# Altium PCB Main_Panel.PcbDoc
Units mm, origin at the board's own origin, x right, y up, seen from the top; angles counter-clockwise.
Board outline 34 x 59 mm, 2 copper layers (Top Layer, Bottom Layer); 4 components, 0 nets, 24 pads, 0 vias.
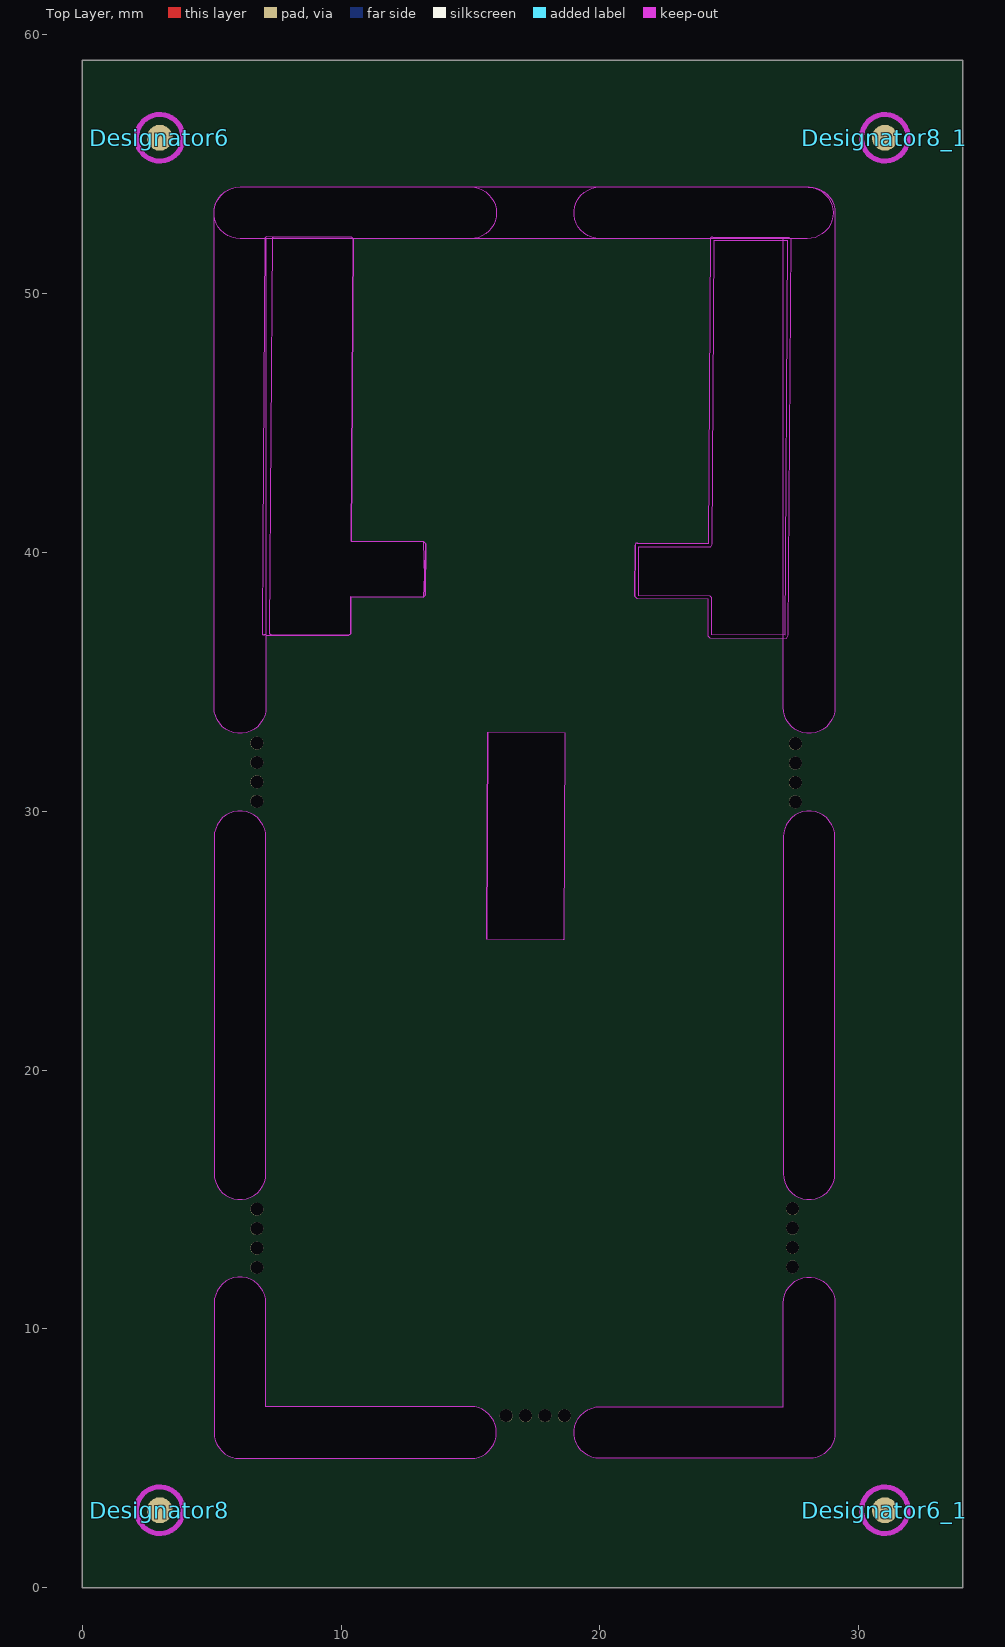
[diagram p0: Top Layer view]
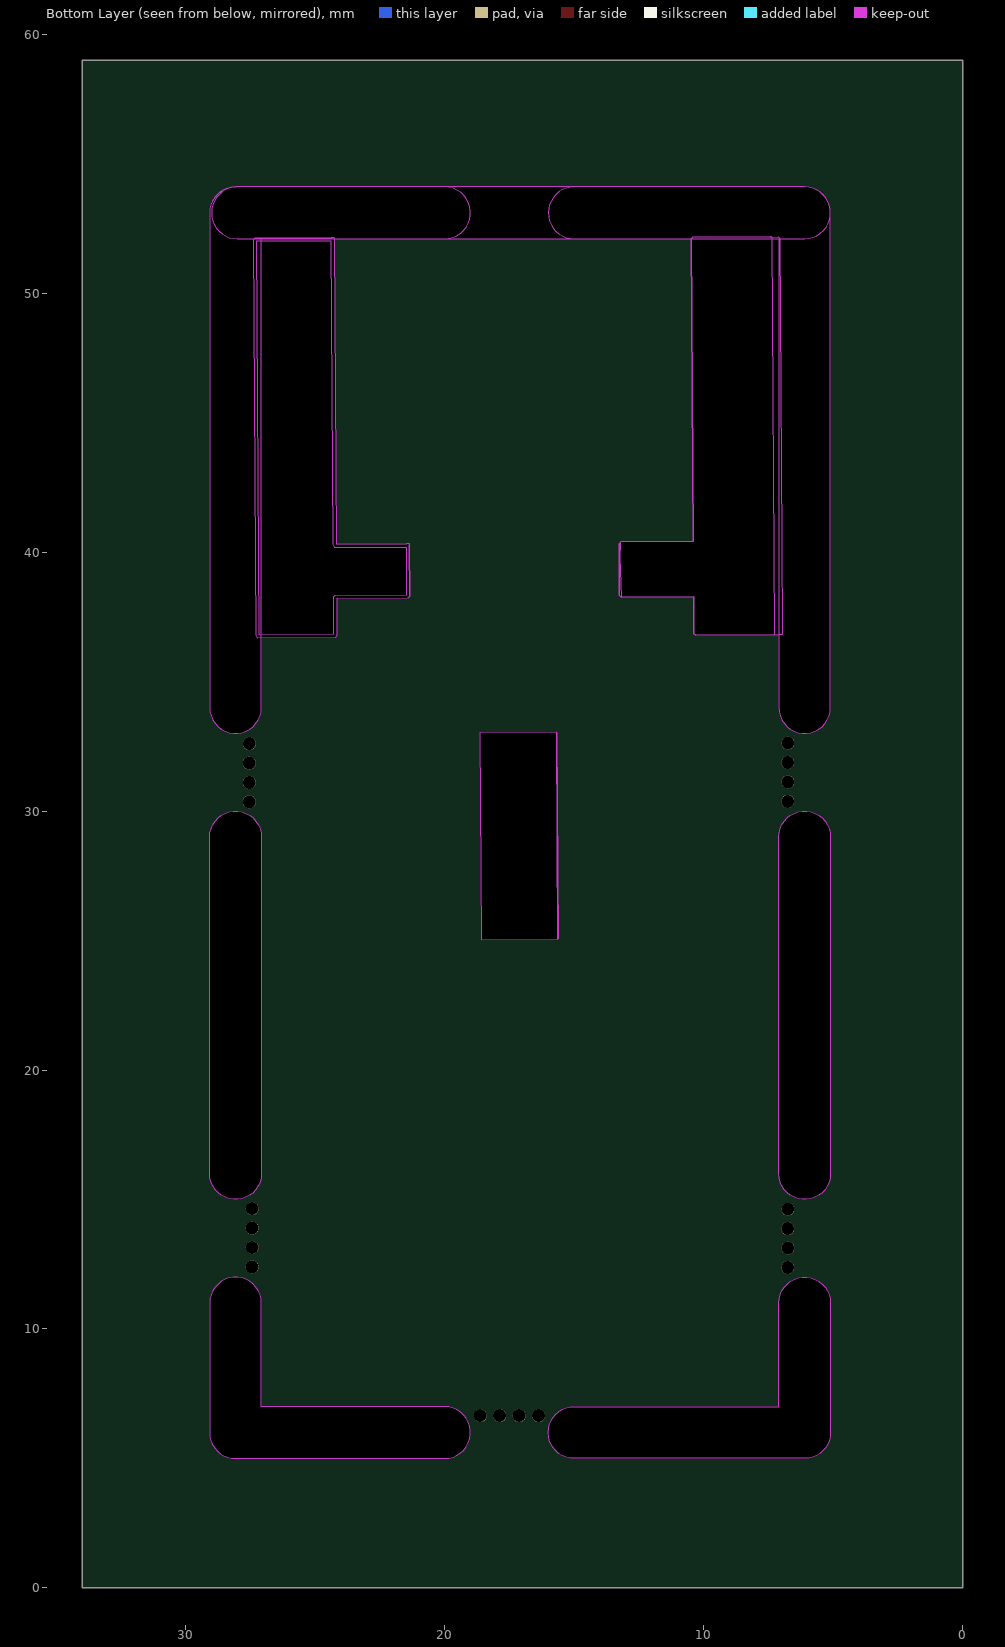
[diagram p1: Bottom Layer view, seen from below]

## Layer stack, top to bottom
Top Solder: solder mask 0.0102, Solder Resist, Dk 3.5
Top Layer: signal copper 0.0356
Dielectric 1: dielectric 0.32, FR-4, Dk 4.8
Bottom Layer: signal copper 0.0356
Bottom Solder: solder mask 0.0102, Solder Resist, Dk 3.5

## Board outline
0,0 0,59 34,59 34,0
cut-out: 5.099,34 5.099,53.099 cw(c6.099,53.099) 6.099,54.099 28,54.099 28.037,54.099 cw(c28.073,53.099) 29.074,53.099 29.074,34 cw(c28.073,34) 27.073,34 27.073,52.098 7.1,52.098 7.1,34 cw(c6.099,34)
cut-out: 5.099,34 5.099,53.099 cw(c6.099,53.099) 6.099,54.099 28,54.099 cw(c28,53.099) 29,53.099 cw(c28,53.099) 28,52.098 7.1,52.098 7.1,34 cw(c6.099,34)
cut-out: 6.099,52.098 cw(c6.099,53.099) 6.099,54.099 28,54.099 cw(c28,53.099) 29,53.099 cw(c28,53.099) 28,52.098
cut-out: 5.099,16 ccw(c6.099,16) 7.1,16 7.1,29 ccw(c6.099,29) 5.099,29
cut-out: 5.099,6 ccw(c6.099,6) 6.099,5 15,5 ccw(c15,6) 16,6 ccw(c15,6) 15,7 7.1,7 7.1,11 ccw(c6.099,11) 5.099,11
cut-out: 20,5 cw(c20,6) 20,7 27.073,7 27.073,11 cw(c28.073,11) 29.074,11 29.074,6 cw(c28.073,6) 28.073,5
cut-out: 27.073,16 ccw(c28.073,16) 29.074,16 29.074,29 ccw(c28.073,29) 27.073,29
cut-out: 20,52.098 cw(c20,53.099) 20,54.099 28.073,54.099 cw(c28.073,53.099) 29.074,53.099 29.074,34 cw(c28.073,34) 27.073,34 27.073,52.098
cut-out: 5.099,34 5.099,53.099 cw(c6.099,53.099) 6.099,54.099 15,54.099 cw(c15,53.099) 16,53.099 cw(c15,53.099) 15,52.098 7.1,52.098 7.1,34 cw(c6.099,34)
cut-out: 6.952,36.868 ccw(c7.016,36.868) 7.056,36.818 7.113,36.784 10.303,36.784 10.374,36.854 10.383,38.279 13.179,38.261 13.25,38.332 13.262,40.331 13.262,40.33 13.25,38.336 13.192,40.407 10.397,40.425 10.475,52.096 10.412,52.16 7.121,52.182 7.056,52.117 6.978,40.402 6.974,40.382
cut-out: 21.345,38.286 21.358,40.259 21.358,40.258 21.345,38.287 21.415,38.21 24.169,38.193 24.159,36.769 24.23,36.692 27.213,36.672 27.279,36.798 27.38,52.08 27.316,52.145 24.366,52.145 ccw(c24.325,52.097) 24.261,52.097 24.183,40.323 21.469,40.323 ccw(c21.422,40.28)
cut-out: 7.253,36.896 7.354,52.117 cw(c7.418,52.116) 7.419,52.18 7.426,52.18 10.412,52.16 10.475,52.096 10.397,40.425 13.192,40.407 13.262,40.331 13.25,38.332 13.25,38.336 13.262,40.33 13.179,38.261 10.383,38.279 10.374,36.855 10.302,36.784 7.309,36.804 cw(c7.31,36.868)
cut-out: 21.48,38.337 24.233,38.32 24.297,38.256 24.294,36.83 27.151,36.814 27.252,52.017 24.388,52.017 24.31,40.3 24.262,40.195 21.485,40.195
cut-out: 15.625,25.049 15.671,33.033 15.618,25.061 15.671,33.038 15.678,33.045 18.638,33.025 18.645,33.013 18.592,25.036 18.585,25.03

## Design rules (kind name [scope] priority, off if disabled: settings)
Clearance [All] p1: gap=0.254 ignorepadtopadclearanceinfootprint=FALSE
PolygonConnect [All] p1: connectstyle=Relief reliefconductorwidth=0.254 reliefentries=4 polygonreliefangle="90 Angle" airgapwidth=0.254
RoutingVias [All] p1: holewidth=0.711 width=1.27 viastyle="Through Hole" minholewidth=0.711 minwidth=1.27 maxholewidth=0.711 maxwidth=1.27
SolderMaskExpansion [All] p1: expansion=0.102 istentingtop=FALSE
Width [All] p1: maxlimit=0.254 minlimit=0.254 preferedwidth=0.254
30 further rules are at their usual default settings.

## Components (designator, comment, footprint, x,y, rotation, side; value= is the part's Value field where it differs from the comment)
Designator6 "Comment" "Fiducial mark" 3,56 r0 top
Designator6_1 "Comment" "Fiducial mark" 31,3 r180 top
Designator8 "Comment" "Fiducial mark" 3,3 r0 top
Designator8_1 "Comment" "Fiducial mark" 31,56 r180 top

## Footprints (in the part's own frame and the unit in brackets; to place one, negate y for a bottom-side part, rotate by r counter-clockwise, add the part's x,y. Pads: shape width x height; smd on the part's side, far side on the other; paste and mask are expansions set on the pad)
"Fiducial mark" [mm]
  round 1 smd paste-1 mask+0.45: 0(0,0)
  Top Layer keep-out circle w0.2: c0,0 r0.9

## Free pads (board coordinates)
  round 0.5 hole 0.5: ""(6.749,12.375) ""(6.749,13.125) ""(6.749,13.875) ""(6.749,14.625) ""(6.749,30.375) ""(6.749,31.125) ""(6.749,31.875) ""(6.749,32.625) ""(16.375,6.65) ""(17.125,6.65) ""(17.875,6.65) ""(18.625,6.65) ""(27.432,12.395) ""(27.432,13.145) ""(27.432,13.895) ""(27.432,14.645) ""(27.543,30.353) ""(27.543,31.103) ""(27.543,31.853) ""(27.543,32.603)

## Nets (pads, with @x,y where several pads share a name; then routed paths per layer and width w, separated by ;. In a path a pad name is that pad's centre, name@x,y a point inside that pad or via, vN(x,y) a via of type N, cw(c..) or ccw(c..) an arc to the next point about the centre after c; other vN are vias at no path point)
pads on no net: Designator6.0 Designator6_1.0 Designator8.0 Designator8_1.0

## Silkscreen, mask and mechanical layers (free items; w line width, h text height)
Mechanical 1:
  lines w0.152: 0,0 0,59 34,59 34,0 0,0
  lines w2: 6.099,11 6.099,6 15,6 ; 6.099,16 6.099,29 ; 6.099,34 6.099,53.099 28,53.099 ; 20,6 28.073,6 28.073,11 ; 20,53.099 28.073,53.099 28.073,34 ; 28.073,16 28.073,29

## Panel: embedded boards
"Main.PcbDoc" at 27,7, 1 rows x 1 columns, spacing 24 x 20, rotation 180